# Altium PCB gocart.PcbDoc
Units mm, origin at the board's own origin, x right, y up, seen from the top; angles counter-clockwise.
Board outline 62.36 x 58.55 mm, 2 copper layers (Top Layer, Bottom Layer); 87 components, 55 nets, 207 pads, 23 vias.
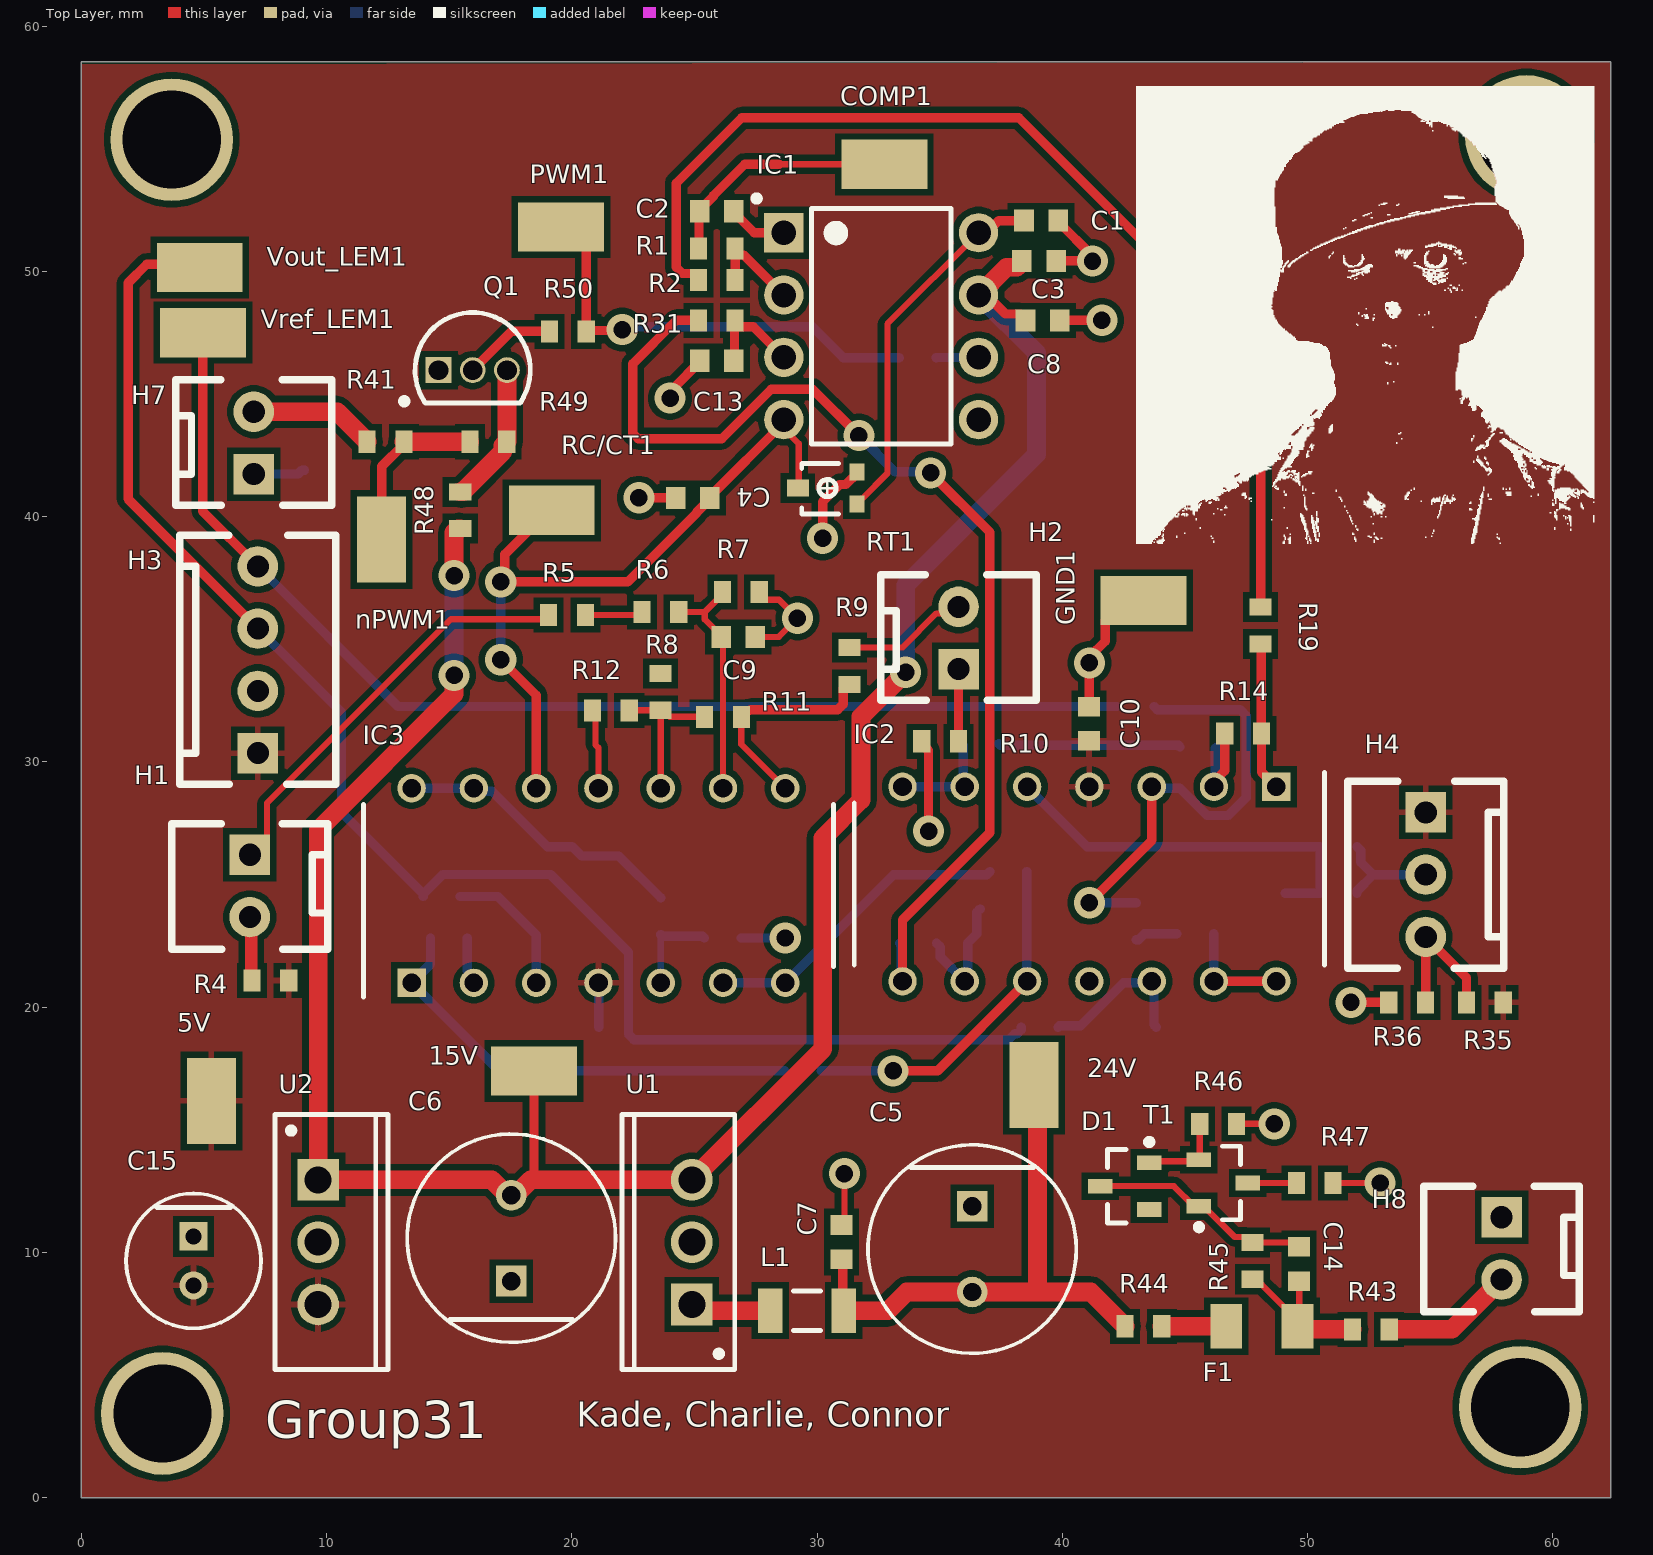
[diagram p0: Top Layer view]
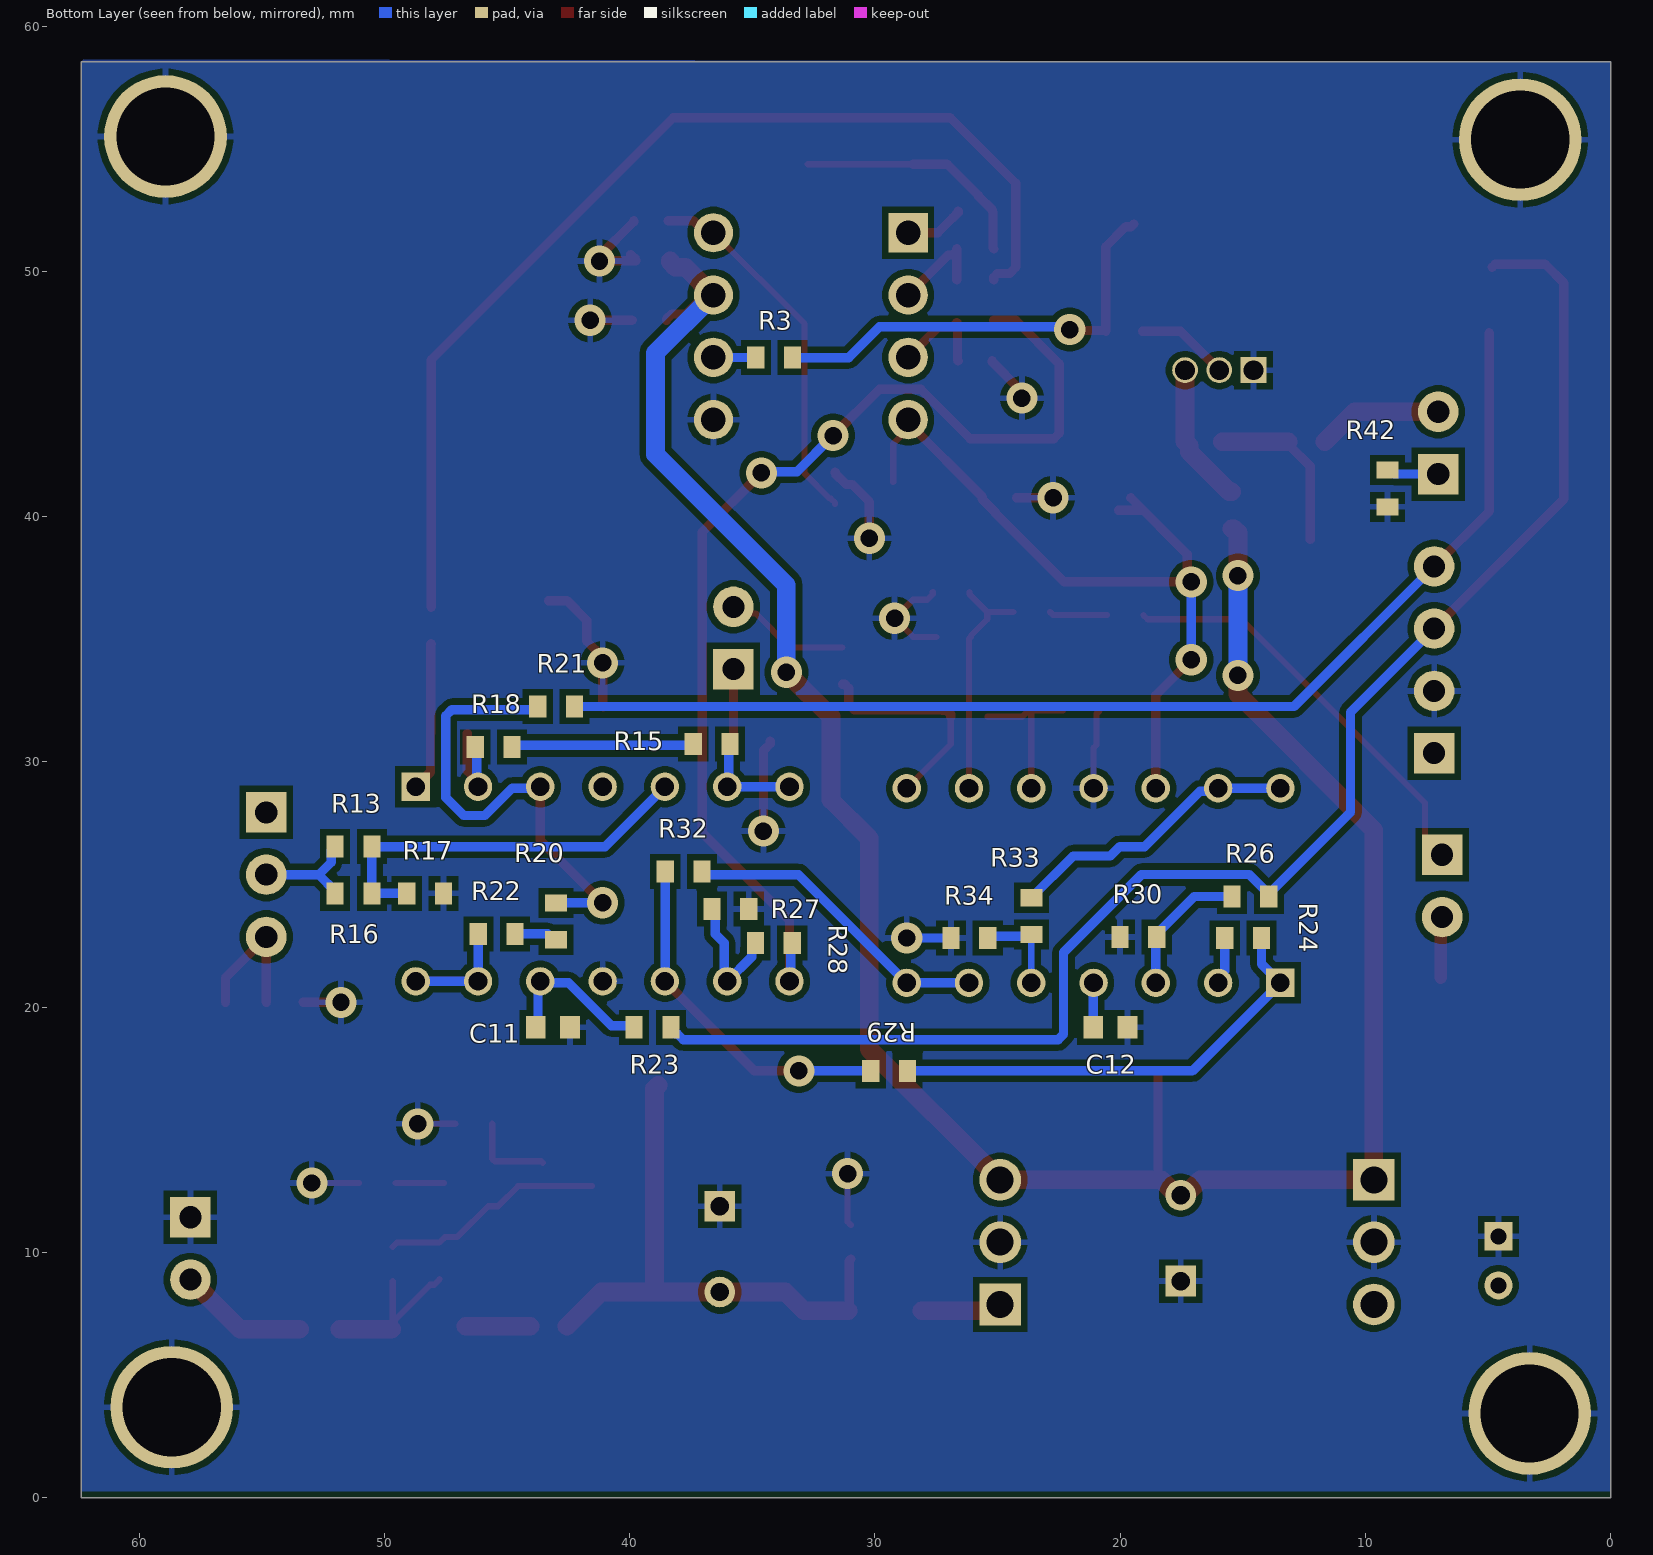
[diagram p1: Bottom Layer view, seen from below]

## Layer stack, top to bottom
Top Solder: solder mask 0.0102, Solder Resist, Dk 3.5
Top Layer: signal copper 0.0356
Dielectric 1: dielectric 0.32, FR-4, Dk 4.8
Bottom Layer: signal copper 0.0356
Bottom Solder: solder mask 0.0102, Solder Resist, Dk 3.5

## Board outline
0,0 62.357,0 62.357,58.547 0,58.547

## Design rules (kind name [scope] priority, off if disabled: settings)
Clearance [All] p1: gap=0.254 ignorepadtopadclearanceinfootprint=FALSE except(0: Arc-Hole Track-Hole SMDPad-Hole THPad-Hole Via-Hole Fill-Hole Poly-Hole Region-Hole Text-Hole)
MinimumSolderMaskSliver [All] p1: minsoldermaskwidth=0.15
PolygonConnect [All] p1: connectstyle=Relief reliefconductorwidth=0.254 reliefentries=4 polygonreliefangle="90 Angle" airgapwidth=0.254
RoutingVias [All] p1: holewidth=0.711 width=1.27 viastyle="Through Hole" minholewidth=0.711 minwidth=1.27 maxholewidth=0.711 maxwidth=1.27
SolderMaskExpansion [All] p1: expansion=0.102 istentingtop=FALSE
Width [All] p1: maxlimit=1.27 minlimit=0.15 preferedwidth=0.381 minimp=50.000000 maximp=50.000000 favimp=50.000000
29 further rules are at their usual default settings.

## Classes and differential pairs
component class volt_regulators: C5 C6 C7 C8 C15 L1 U1 U2
component class test_points: 5V 15V 24V COMP1 GND1 nPWM1 PWM1 Vout_LEM1 Vref_LEM1
component class pwm_inverter: Q1 R48 R49 R50
component class i_sense: 10K C12 C13 IC3 R24 R26 R27 R28 R29 R30 R31 R32 R33 R34
component class headers: C14 D1 F1 H3 H4 H7 H8 R35 R36 R41 R42 R43 R44 R45 R46 R47 T1
component class current_mode_controller: C1 C2 C3 C4 IC1 R1 R2 R3 RT1
component class brake_circuit: C9 H1 H2 R4 R5 R6 R7 R8 R9 R10 R11 R12
component class accelerator: C10 C11 IC2 R13 R14 R15 R16 R17 R18 R19 R20 R21 R22 R23

## Components (designator, comment, footprint, x,y, rotation, side; value= is the part's Value field where it differs from the comment)
5V "TP" TP_1206 5.3,16.176 r270 top
15V "TP" TP_1206 18.459,17.399 r180 top
24V "TP" TP_1206 38.838,16.818 r270 top
C1 "100nF" CAPC1608L 39.136,52.07 r180 top
C2 "1nF" CAPC1608L 25.908,52.451 r0 top
C3 "100nF" CAPC1608L 39.047,50.431 r0 top
C4 "22nF" CAPC1608L 24.929,40.767 r0 top
C5 "100uF" FP-ESLGM-MFG 36.322,10.132 r270 top
C6 "100uF" FP-ESLGM-MFG 17.532,10.578 r90 top
C7 "100nF" CAPC1608L 30.988,10.414 r270 top
C8 "100nF" CAPC1608L 39.198,48.006 r180 top
C9 "100nF" CAPC1608L 26.784,35.095 r0 top
C10 "1uF" CAPC1608L 41.084,31.554 r270 top
C11 "1uF" CAPC1608L 43.135,19.177 r0 bottom
C12 "100nF" CAPC1608L 20.402,19.177 r0 bottom
C13 "15nF" CAPC1608L 25.908,46.355 r0 top
C14 "15nF" CAPC1608L 49.657,9.525 r270 top
C15 "1uF" FP-UPW1E220MDD-MFG 4.572,9.652 r270 top value=22uF
COMP1 "TP" TP_1206 32.742,54.368 r180 top
D1 "4V7" SOT23_L 42.545,12.7 r180 top
F1 "5A" RESC3216N 48.133,6.985 r180 top
GND1 "TP" TP_1206 43.307,36.576 r0 top
H1 "brake switch" MOLEX_KK_2_HDR 6.867,26.212 r270 top value="2 Pin Molex KK HDR"
H2 "shutdown header" MOLEX_KK_2_HDR 35.769,33.782 r90 top value="2 Pin Molex KK HDR"
H3 "LEM (i_motor hall sensor)" MOLEX_KK_4_HDR 7.194,30.353 r90 top value="4 Pin Molex KK Hdr"
H4 "Acc header" MOLEX_KK_3_HDR 54.819,27.94 r270 top value="3 Pin Molex KK Hdr"
H7 "pwm connector" MOLEX_KK_2_HDR 7.029,41.737 r90 top value="2 Pin Molex KK HDR"
H8 "reverse polarity protection" MOLEX_KK_2_HDR 57.912,11.43 r270 top value="2 Pin Molex KK HDR"
IC1 "UC3843BNG" DIP794W56P254L959H533Q8B 32.615,47.764 r0 top
IC2 "LMC6484IN" DIP794W56P254L1905H533Q14N 41.103,25.019 r270 top
IC3 "LMC6484IN" DIP794W56P254L1905H533Q14N 21.084,24.956 r90 top
L1 "1A max, Idc 0.3R," INDC3216L 29.591,7.62 r180 top
nPWM1 "TP" TP_1206 12.241,39.065 r90 top
PWM1 "TP" TP_1206 19.558,51.816 r180 top
Q1 "2N7000G" ONSC-TO-92-3-29-11 15.957,45.974 r0 top
R1 "0R" RESC1608L 25.908,50.927 r180 top
R2 "10K" RESC1608L 25.908,49.657 r0 top
R3 "0R" RESC1608L 34.106,46.482 r180 bottom
R4 "0R" RESC1608L 7.702,21.082 r0 top
R5 "0R" RESC1608L 19.799,35.984 r0 top
R6 "100K" RESC1608L 23.609,36.111 r0 top
R7 "100K" RESC1608L 26.892,36.931 r0 top
R8 "10K" RESC1608L 23.621,32.852 r90 top
R9 "0R" RESC1608L 31.324,33.909 r90 top
R10 "0R" RESC1608L 35.017,30.839 r0 top
R11 "10K" RESC1608L 26.161,31.836 r180 top
R12 "10K" RESC1608L 21.589,32.09 r0 top
R13 "0R" RESC1608L 51.263,26.543 r180 bottom
R14 "0R" RESC1608L 47.374,31.158 r180 top
R15 "0R" RESC1608L 36.658,30.734 r180 bottom
R16 "0R" RESC1608L 51.263,24.638 r180 bottom
R17 "0R" RESC1608L 48.342,24.638 r180 bottom
R18 "0R" RESC1608L 45.548,30.607 r180 bottom
R19 "0R" RESC1608L 48.088,35.56 r270 top
R20 "0R" RESC1608L 43.008,23.495 r270 bottom
R21 "0R" RESC1608L 42.996,32.258 r180 bottom
R22 "0R" RESC1608L 45.421,22.987 r0 bottom
R23 "0R" RESC1608L 39.071,19.177 r0 bottom
R24 "0R" RESC1608L 14.985,22.819 r180 bottom
R26 "10K" RESC1608L 14.687,24.511 r0 bottom
R27 "10K" RESC1608L 35.896,24.003 r0 bottom
R28 "10K" RESC1608L 34.118,22.606 r180 bottom
R29 "10K" RESC1608L 29.419,17.399 r180 bottom
R30 "0R" RESC1608L 19.259,22.86 r180 bottom
R31 "1K" RESC1608L 25.908,48.006 r0 top
R32 "10K" RESC1608L 37.801,25.527 r0 bottom
R33 "0R" RESC1608L 23.621,23.708 r270 bottom
R34 "10K" RESC1608L 26.149,22.819 r180 bottom
R35 "0R" RESC1608L 57.232,20.193 r0 top
R36 "0R" RESC1608L 54.057,20.193 r0 top
R41 "0R" RESC1608L 12.401,43.053 r180 top
R42 "0R" RESC1608L 9.099,41.148 r90 bottom
R43 "0R" RESC1608L 52.578,6.858 r0 top
R44 "0R" RESC1608L 43.307,6.985 r0 top
R45 "12K" RESC1608L 47.752,9.652 r90 top
R46 "0R" RESC1608L 46.355,15.24 r180 top
R47 "0R" RESC1608L 50.292,12.827 r0 top
R48 "0R" RESC1608L 15.449,40.259 r270 top
R49 "0R" RESC1608L 16.592,43.053 r0 top
R50 "0R" RESC1608L 19.837,47.555 r180 top
RC/CT1 "TP" TP_1206 19.177,40.259 r180 top
RT1 "100K" PVZ2A 30.423,41.163 r90 top
T1 "BSH114,215" SOT23_L 46.57,12.827 r0 top
U1 "L7815CV" TO220 24.892,10.414 r90 top
U2 "L7805ACV" TO220 9.652,10.414 r270 top
Vout_LEM1 "TP" TP_1206 4.826,50.165 r180 top
Vref_LEM1 "TP" TP_1206 4.953,47.498 r0 top

## Footprints (in the part's own frame and the unit in brackets; to place one, negate y for a bottom-side part, rotate by r counter-clockwise, add the part's x,y. Pads: shape width x height; smd on the part's side, far side on the other; paste and mask are expansions set on the pad)
CAPC1608L [mm]
  rect 0.8x0.9 smd: 1(-0.7,0) 2(0.7,0)
  body extent -0.87,-0.48 0.87,0.48, height 0.85
DIP794W56P254L959H533Q8B [mm]
  rect 1.6x1.6 hole 1: 1(-3.97,3.81)
  round 1.6 hole 1: 2(-3.97,1.27) 3(-3.97,-1.27) 4(-3.97,-3.81) 5(3.97,-3.81) 6(3.97,-1.27) 7(3.97,1.27) 8(3.97,3.81)
  silkscreen extent -5.2,-4.8 2.85,5.33, body extent -4.11,-4.79 4.11,4.79, height 5.33
DIP794W56P254L1905H533Q14N [mm]
  rect 1.159x1.159 hole 0.759: 1(-3.969,7.62)
  round 1.159 hole 0.759: 2(-3.969,5.08) 3(-3.969,2.54) 4(-3.969,0) 5(-3.969,-2.54) 6(-3.969,-5.08) 7(-3.969,-7.62) 8(3.969,-7.62) 9(3.969,-5.08) 10(3.969,-2.54) 11(3.969,0) 12(3.969,2.54) 13(3.969,5.08) 14(3.969,7.62)
  silkscreen extent -4.55,-9.59 3.3,9.59, body extent -4.11,-9.52 4.11,9.53, height 5.33
FP-ESLGM-MFG [mm]
  rect 1.25x1.25 hole 0.75 paste-2539.97 mask+0: 1(-1.75,0)
  round 1.25 hole 0.75 paste-2539.97 mask+0: 2(1.75,0)
  silkscreen extent -4.25,-4.25 4.25,4.25, body extent -4.35,-4.35 4.35,4.35, height 0.25
FP-UPW1E220MDD-MFG [mm]
  rect 1.15x1.15 hole 0.65 paste-2539.97 mask+0: 1(-1,0)
  round 1.15 hole 0.65 paste-2539.97 mask+0: 2(1,0)
  silkscreen extent -2.75,-2.75 2.75,2.75, body extent -2.85,-2.85 2.85,2.85, height 0.25
INDC3216L [mm]
  rect 1x1.8 smd: 1(-1.5,0) 2(1.5,0)
  silkscreen extent -0.55,-0.8 0.55,0.8, body extent -1.75,-0.95 1.75,0.95, height 1.9
MOLEX_KK_2_HDR [mil]
  rect 65x65 hole 35.43: 1(0,0)
  round 65 hole 35.43: 2(100,0)
  silkscreen extent -50,-125 152,125, body extent -44,-121 146,119, height 630
MOLEX_KK_3_HDR [mil]
  rect 65x65 hole 35.43: 1(0,0)
  round 65 hole 35.43: 2(100,0) 3(200,0)
  silkscreen extent -50,-125 250,125, body extent -44,-120 244,119, height 10
MOLEX_KK_4_HDR [mil]
  rect 65x65 hole 35.43: 1(0,0)
  round 65 hole 35.43: 2(100,0) 3(200,0) 4(300,0)
  silkscreen extent -50,-125 350,125, body extent -44,-119 343,119, height 630
ONSC-TO-92-3-29-11 [mm]
  rect 1.05x1.05 hole 0.8: 1(-1.397,0)
  round 1.05 hole 0.8: 2(0,0) 3(1.397,0)
  silkscreen extent -2.92,-1.39 2.35,2.35, body extent -2.35,-1.33 2.36,2.36, height 7.87
PVZ2A [mm]
  rect 0.7x0.6 smd: 1(-0.65,-1.2) 3(0.65,-1.2)
  rect 0.7x0.9 smd: 2(0,1.2)
  silkscreen extent -1.05,-0.45 1,1.05, body extent -0.95,-0.82 0.92,0.96, height 1.6
RESC1608L [mm]
  rect 0.7x0.9 smd: 1(-0.75,0) 2(0.75,0)
  body extent -0.85,-0.48 0.85,0.48, height 0.9
RESC3216N [mm]
  rect 1.3x1.8 smd: 1(-1.45,0) 2(1.45,0)
  body extent -1.68,-0.87 1.68,0.87, height 0.71
SOT23_L [mm]
  rect 1x0.6 smd: 1(-1,-0.95) 2(-1,0.95) 3(1,0)
  silkscreen extent -1.13,-1.92 0.7,1.5, body extent -0.7,-1.5 0.7,1.5, height 1.1
TO220 [mm]
  rect 1.7x1.7 hole 1.1: 1(-2.54,0)
  round 1.7 hole 1.1: 2(0,0) 3(2.54,0)
  silkscreen extent -5.2,-1.75 5.2,2.85, body extent -5.25,-1.8 5.25,2.9, height 19.7
TP_1206 [mm]
  rect 3.5x2 smd: 1(0,0)
  body extent -1.62,-0.85 1.63,0.8, height 2

## Part data
5V 15V 24V COMP1 GND1 nPWM1 PWM1 RC/CT1 Vout_LEM1 Vref_LEM1: library part TP_1206, "Test-Point 3.3x1.6x2.1mm SMD", Manufacturer="Harwin Inc", Manufacturer Part Number=S1751-46R, Supplier Part Number 1=952-1478-2-ND, Mounting Type="Surface Mount", Storage Location=ProtoPlace, Supplier="ECE Dept", Supplier 1=Digi-Key, Supplier 2=Farnell, Supplier Part Number 2=1826282, Type="PC Test Point"
C1 C3 C7 C8 C9 C12: library part CC_100nF_0603, "CAP CER 100nF X7R +-10% 50V 0603", Code_IPC="1608 [0603]", PackageReference=0603, Storage Location="PCB Assembly WS", Supplier="ECE Dept"
C2: library part CC_1nF_0603, "CAP CER 1nF X7R +-10% 50V 0603", Code_IPC="1608 [0603]", PackageReference=0603, Storage Location="PCB Assembly WS", Supplier="ECE Dept"
C4: library part CC_22nF_0603, "CAP CER 22nF X7R +-10% 50V 0603", Code_IPC="1608 [0603]", PackageReference=0603, Storage Location="PCB Assembly WS", Supplier="ECE Dept"
C5 C6: library part CMP-03015-000005-1, "CAP ALUM 100UF 20% 50V THRU HOLE. Part Number: ESL107M050AGMAA. Dia: 8mm.", Leakage Current=50uA, Manufacturer=KEMET, Manufacturer Part Number=ESL107M050AGMAA, Package=ESLGM, Ripple Current=725mA, Temperature="-40°C to +105°C", Temperature Range High=+105°C, Temperature Range Low=-40°C, Tolerance=20%, Voltage Rating=50V, Automotive=No, Capacitance=100uF, Category=Cap, ComponentLink2Description=Datasheet, ComponentLink2URL=https://content.kemet.com/datasheets/KEM_A4074_ESL.pdf, Device Class L1="Passive Components", Device Class L2=Capacitors, Device Class L3="Aluminum Electrolytic Capacitors", Digikey Description="CAP ALUM 100UF 20% 50V THRU HOLE", Dissipation Factor=10%, Esr=0.12Ω, Height=13.5mm, Lead Free=Yes, Life=10000Hours, Manufacturer 1=KEMET, Manufacturer Part Number 1=ESL107M050AGMAA, Material=Aluminum, Octopart=https://octopart.com/esl107m050agmaa-kemet-84758890, RoHS=TRUE
C10 C11: library part CC_1uF_0603, "CAP CER 1uF Y5V -20% +80% 16V 0603", Max Voltage=16V, Code_IPC="1608 [0603]", PackageReference=0603, Storage Location="PCB Assembly WS", Supplier="ECE Dept"
C13 C14: library part CC_15nF_0603, "CAP CER 15nF X7R +-10% 50V 0603", Code_IPC="1608 [0603]", PackageReference=0603, Storage Location="PCB Assembly WS", Supplier="ECE Dept"
C15: library part CMP-12462-000010-1, "CAP ALUM 22UF 20% 25V RADIAL. Part Number: UPW1E220MDD. Dia: 5mm.", Capacitance=22uF, Leakage Current=16.5uA, Manufacturer=Nichicon, Manufacturer Part Number=UPW1E220MDD, Package=0, Ripple Current=180mA, Temperature="-55°C to +105°C", Temperature Range High=+105°C, Temperature Range Low=-55°C, Tolerance=20%, Voltage Rating=25V, Automotive=Yes, Automotive Grade="Grade 2", Category=Cap, ComponentLink2Description=Datasheet, ComponentLink2URL=https://products.nichicon.co.jp/en/pdf/XJA043/e-upw.pdf, Device Class L1="Passive Components", Device Class L2=Capacitors, Device Class L3="Aluminum Electrolytic Capacitors", Digikey Description="CAP ALUM 22UF 20% 25V RADIAL", Dissipation Factor=14%, Height=12.5mm, Lead Free=Yes, Life=2000Hours, Manufacturer 1=Nichicon, Manufacturer Part Number 1=UPW1E220MDD, Material=Aluminum, Octopart=https://octopart.com/upw1e220mdd-nichicon-202818, RoHS=TRUE
D1: library part DZ_4.7V, "BZX84C4V7LT1G - DIODE, ZENER, 4.7V, 225MW, SOT23", Breakdown Voltage Max=5, Breakover Voltage Min=4.7, Diode Case Style=SOT-23, Manufacturer="ON SEMICONDUCTOR", Manufacturer Part Number=BZX84C4V7LT1G, Power Dissipation Pd=225, Supplier Part Number 1=1459051, Supplier 1=Farnell, Supplier 2=Digi-Key, Supplier Part Number 2=BZX84C4V7LT1GOSCT-ND
F1: library part FS_Fuse_5.0A, "Fuse 5.0A Fast Acting 1206 SMD", Case Code (Imperial)=1206, Case Code (Metric)=3216, DC Cold Resistance=19mR, Manufacturer="Bel TRP", Manufacturer Part Number=C1F5, Max Operating Temperature=125°C, Min Operating Temperature=-55°C, Supplier Part Number 1=507-1886-1-ND, Voltage Rating=125V, Voltage Rating (DC)=63V, Approvals=CE,cURus, Case/Package=1206, ComponentLink1Description=http://www.farnell.com/datasheets/2571625.pdf, ComponentLink1URL=http://www.farnell.com/datasheets/2571625.pdf, ComponentLink2Description=http://belfuse.com/pdfs/C1F.pdf, ComponentLink2URL=http://belfuse.com/pdfs/C1F.pdf, ComponentLink3Description=http://www.mouser.com/ds/2/643/C1F-594910.pdf, ComponentLink3URL=http://www.mouser.com/ds/2/643/C1F-594910.pdf, ComponentLink4Description=https://belfuse.com/resources/StewartConnector/C1F.pdf, ComponentLink4URL=https://belfuse.com/resources/StewartConnector/C1F.pdf, Contact Plating=Nickel,Tin, Current Rating=5A, Fuse Type="Board Mount (Cartridge Style Excluded)", Length=0.126inch, Mount="Surface Mount", Number of Pins=2, Packaging="Tape and Reel", Pricing 1="1=0.32, 5=0.312, 10=0.298, 50=0.2662, 100=0.2479, 250=0.22032, 500=0.1836, 1000=0.17442 (USD)", Stock 1=725, Supplier 1=Digi-Key, Supplier 2=Element14, Supplier Part Number 2=2848595, Voltage Rating (AC)=125V, Width=0.062inch
H1: library part JA_MOLEX_KK_2POS, Supplier Part Number 1=1462926, Storage Location="ECE Dept Store", Supplier="ECE Dept", Supplier 1=Farnell
H2 H7 H8: library part JA_MOLEX_KK_2POS, "CONN HEADER 2POS 2.54mm VERT_Thru Hole", Supplier Part Number 1=1462926, Storage Location="ECE Dept Store", Supplier="ECE Dept", Supplier 1=Farnell
H3: library part JA_MOLEX_KK_4POS, "CONN HEADER 4POS 2.54mm VERT_Thru Hole", Manufacturer=Molex, Manufacturer PN=22-23-2041, Supplier Part Number 1=9731164, Storage Location="ECE Dept Store", Supplier="ECE Dept", Supplier 1=Farnell
H4: library part JA_MOLEX_KK_3POS, "CONN HEADER 3POS 2.54mm VERT_Thru Hole", Manufacturer=Molex, Manufacturer PN=22-23-2031, Supplier Part Number 1=9731156, Storage Location="ECE Dept Store", Supplier="ECE Dept", Supplier 1=Farnell
IC1: "Integrated Circuit", Manufacturer_Name="ON Semiconductor", Mouser Part Number=863-UC3843BNG, Arrow Part Number=UC3843BNG, Arrow Price/Stock=https://www.arrow.com/en/products/uc3843bng/on-semiconductor, Datasheet Link=http://www.onsemi.com/pub/Collateral/UC3842B-D.PDF, Height=5.33mm, Manufacturer_Part_Number=UC3843BNG, Mouser Price/Stock=https://www.mouser.co.uk/ProductDetail/ON-Semiconductor/UC3843BNG?qs=xZq1yRCsb1c8CkSt0UbHMA%3D%3D
IC2 IC3: "Integrated Circuit", Manufacturer_Name="Texas Instruments", Mouser Part Number=926-LMC6484IN, Arrow Part Number=LMC6484IN, Datasheet Link=http://www.ti.com/lit/gpn/lmc6484, Height=5.334mm, Manufacturer_Part_Number=LMC6484IN, Mouser Price/Stock=https://www.mouser.com/Search/Refine.aspx?Keyword=926-LMC6484IN
L1: library part IN_Ferrite-Bead, "Ferrite Bead, Rdc 0.3R, Z100MHZ 600R, Imax 1A, SMD 1206", DC Current Rating=1, DC Resistance Max=0.08, Ferrite Case Style="1206 ^3216 Metric]", Frequency Range="50MHz to 1", Impedance Tolerance="± 25%", Manufacturer=FAIR-RITE, Manufacturer Part Number=2512066017Y1, Supplier Part Number 1=1612060, Ferrite Mounting=SMD, Impedance=600, Manufacturer PN=2512066017Y1, Storage Location="PCB Assembly WS", Supplier="ECE Dept", Supplier 1=Farnell
Q1: library part CMP-1058-00937-1, "Small Signal MOSFET, 200 mA, 60 V, N-Channel, 3-Pin TO-92, Pb-Free, Bulk Box", Manufacturer="On Semiconductor", Manufacturer 1="ON Semiconductor", Package Type=TO-92, Channel Polarity="N Channel", Ciss Typ (pF)=60, ComponentLink1Description="Manufacturer URL", ComponentLink1URL=http://www.onsemi.com/, ComponentLink2Description=Datasheet, ComponentLink2URL=http://www.onsemi.com/pub_link/Collateral/2N7000-D.PDF, ComponentLink3Description="Package Specification", ComponentLink3URL=http://www.onsemi.cn/pub_link/Collateral/2N6426-D.PDF, Configuration=Single, Coss Typ (pF)=25, Crss Typ (pF)=5, DatasheetVersion="Rev. 8", ID Max (A)=0.2, Manufacturer Part Number 1=2N7000G, Mounting Technology="Through Hole", PackageDescription="3-Pin Transistor Outline, Body 4.825 x 3.685 mm, Pitch 1.27 mm", PackageReference=TO-92-3-29-11_AM_SL, PackageVersion="Rev. AM", Packing="Bulk Box", PartNumber=2N7000G, PD Max (W)=0.35, RoHS=Pb-Free, V(BR)DSS Min (V)=60, VGS Max (V)=20, VGS(th) Max (V)=3
R1 R3 R4 R5 R9 R10 R13 R14 R15 R16 R17 R18 R19 R20 R21 R22 R23 R24 R30 R33 R35 R36 R41 R42 R43 R44 R45 R46 R47 R48 R49 R50: library part RS_0R0, "RES 0.0 OHM 1/10W 5% 0603 SMD", Storage Location="PCB Assembly WS", Supplier="ECE Dept"
R2 R8 R11 R12 R26 R27 R28 R29 R32 R34: library part RS_10K, "RES 10.0K OHM 1/10W 5% 0603 SMD", Storage Location="PCB Assembly WS", Supplier="ECE Dept"
R6 R7: library part RS_100K, "RES 100K OHM 1/10W 5% 0603 SMD", Storage Location="PCB Assembly WS", Supplier="ECE Dept"
R31: library part RS_1K, "RES 1.0K OHM 1/10W 5% 0603 SMD", Storage Location="PCB Assembly WS", Supplier="ECE Dept"
RT1: library part RM_100K, "Trim Pot SMD 100K Murata PVZ2 Series SMD", Manufacturer=MURATA, Manufacturer Part Number=PVZ2A104C04B00, Power Rating=50, Resistor Element Material="Metal Foil", Supplier Part Number 1=1771728, Adjustment Type=Top, External Depth=2.7, External Length / Height=0.85, External Width=2.1, No. of Turns=1, Potentiometer Mounting=SMD, Series=PVZ2, Storage Location="PCB Assembly WS", Supplier="ECE Dept", Supplier 1=Farnell
T1: library part TM_BSH114, "MOSFET N-CH 100V 0.85A SOT-23", Continuous Drain Current Id=500, Current Id Max=850, Drain Source Voltage Vds=100, Power Dissipation Pd=830, Supplier Part Number 1=1758071RL, Transistor Case Style=SOT-23, Voltage Vds Typ=130, Voltage Vgs Max=3, Voltage Vgs Rds on Measurement=10, Manufacturer Part Number=BSH114,215, Supplier 1=Farnell, Transistor Type=Enhancement
U1: library part CMP-0244-00422-1, "Positive Voltage Regulator, 15V, 3-Pin TO-220", Manufacturer 1=STMicroelectronics, ComponentLink1Description="Manufacturer URL", ComponentLink1URL=http://www.st.com, ComponentLink2Description=Datasheet, ComponentLink2URL=http://www.st.com/internet/com/TECHNICAL_RESOURCES/TECHNICAL_LITERATURE/DATASHEET/CD00000444.pdf, ComponentLink3Description="Package Specification", ComponentLink3URL=http://www.st.com/internet/com/TECHNICAL_RESOURCES/TECHNICAL_LITERATURE/PACKAGE_INFORMATION/CD00004649.pdf, DatasheetVersion=16/11/2011, Manufacturer Part Number 1=L7815CV, PackageDescription="TO, Thru-Hole, Vertical, Heatsink Mounted; 3 In-Line Leads; Pitch 2.54 mm", PackageReference=TO220, PackageVersion=ver3.0
U2: library part CMP-0244-00484-1, "Positive Voltage Regulator, 5V, 3-Pin TO-220", Manufacturer 1=STMicroelectronics, ComponentLink1Description="Manufacturer URL", ComponentLink1URL=http://www.st.com, ComponentLink2Description=Datasheet, ComponentLink2URL=http://www.st.com/internet/com/TECHNICAL_RESOURCES/TECHNICAL_LITERATURE/DATASHEET/CD00000444.pdf, ComponentLink3Description="Package Specification", ComponentLink3URL=http://www.st.com/internet/com/TECHNICAL_RESOURCES/TECHNICAL_LITERATURE/PACKAGE_INFORMATION/CD00004649.pdf, DatasheetVersion=16/11/2011, Manufacturer Part Number 1=L7805ACV, PackageDescription="TO, Thru-Hole, Vertical, Heatsink Mounted; 3 In-Line Leads; Pitch 2.54 mm", PackageReference=TO220, PackageVersion=ver3.0

## Free pads (board coordinates)
  round 5 hole 4: 2(58.674,3.683) 4(3.683,55.372) 5(3.302,3.429) ""(58.928,55.499)

## Via types
v1: diameter 1.27, hole 0.711, Top Layer to Bottom Layer, 23 vias

## Nets (pads, with @x,y where several pads share a name; then routed paths per layer and width w, separated by ;. In a path a pad name is that pad's centre, name@x,y a point inside that pad or via, vN(x,y) a via of type N, cw(c..) or ccw(c..) an arc to the next point about the centre after c; other vN are vias at no path point)
5V: 5V.1 C10.2 C12.2 C15.2 H3.1 H4.1 IC2.4 IC3.4 R4.2 R35.2 U2.3 | length 1.8
  Bottom Layer w0.381: IC3.4 21.093,20.978 21.093,19.186 C12.2
15V: 15V.1 C3.1 C6.2 C8.2 IC1.7 R48.2 U1.3 U2.1 | length 97.8
  Top Layer w0.381: C6.2 18.459,13.254 15V.1 ; IC1.7 36.915,49.034 37.683,48.265 38.289,48.265 38.498,48.056 C8.2
  Top Layer w0.762: v1(15.195,33.528) 15.195,32.766 9.652,27.223 U2.1 16.736,12.954 17.362,12.328 C6.2 17.702,12.328 18.329,12.954 U1.3 30.226,18.288 30.226,26.879 31.791,28.444 31.791,31.833 v1(33.61,33.653) ; v1(15.195,37.592) 15.195,39.349 15.355,39.509 R48.2 ; IC1.7 37.722,50.172 38.137,50.172 38.347,50.381 C3.1
  Bottom Layer w0.762: v1(15.195,33.528) v1(15.195,37.592) ; v1(33.61,33.653) 33.61,37.211 38.944,42.545 38.944,46.675 IC1.7
24V: 24V.1 C5.2 C7.2 L1.1 R44.1 | length 23
  Top Layer w0.381: C7.2 31.04,9.663 31.04,7.671 L1.1
  Top Layer w0.762: L1.1 32.893,7.62 33.655,8.382 C5.2 38.989,8.382 ; 24V.1 38.989,16.667 38.989,8.382 ; R44.1 41.16,8.382 38.989,8.382
Acc_pot: H4.2 R13.1 R16.1 | length 4.6
  Bottom Layer w0.381: R16.1 52.013,24.738 52.675,25.4 ; R13.1 52.173,26.384 52.173,25.902 52.675,25.4 ; H4.2 52.675,25.4
COMP: C2.1 COMP1.1 R1.2 | length 9.9
  Top Layer w0.254: 28.448,54.368 COMP1.1
  Top Layer w0.381: R1.2 25.183,50.952 25.183,52.426 C2.1 25.208,52.501 25.763,53.057 25.763,53.085 27.047,54.368 28.448,54.368
Error: R2.1 R19.1 | length 43.7
  Top Layer w0.381: R2.1 25.158,49.757 24.998,49.917 24.505,49.917 24.257,50.165 24.257,53.594 26.924,56.261 38.227,56.261 48.088,46.4 R19.1
GND: C1.1 C3.2 C4.1 C5.1 C6.1 C7.1 C8.1 C9.2 C10.1 C11.1 C12.1 C13.1 C15.1 GND1.1 H3.2 H8.1 IC1.5 IC2.11 IC3.11 pad. pad.2 pad.4 pad.5 Q1.1 R7.2 R10.1 R12.1 R17.2 R27.1 R30.1 R34.1 R36.1 R42.1 R46.1 R47.2 RT1.3 U1.2 U2.2 | length 38.2
  Top Layer w0.254: R12.1 20.962,31.967 20.962,30.699 21.084,30.576 IC3.11 ; C4.1 C4.1@24.257,40.795 ; C9.2 28.435,35.095 v1(29.197,35.857) 28.446,36.608 27.865,36.608 27.642,36.831 R7.2 ; C7.1 31.115,11.241 v1(31.115,13.208) ; R46.1 v1(48.641,15.24) ; R47.2 v1(52.959,12.827)
  Top Layer w0.381: v1(22.733,40.767) C4.1 ; v1(24.003,44.831) 24.173,45.001 24.173,45.27 25.208,46.305 C13.1 ; v1(30.226,39.116) 30.226,40.613 30.92,41.308 31.168,41.308 31.623,41.763 RT1.3 ; R10.1 34.267,30.739 34.544,30.462 v1(34.544,27.178) ; C1.1 39.836,52.02 41.23,50.626 v1(41.23,50.419) ; C8.1 v1(41.611,48.006) ; C3.2@39.956,50.691 39.747,50.481 C3.2 v1@40.964,50.431 ; C10.1 41.094,32.263 41.094,34.027 v1(41.103,34.036) 41.103,34.277 41.747,34.921 41.747,35.766 42.557,36.576 GND1.1 ; v1(51.771,20.193) R36.1
  Bottom Layer w0.381: R34.1 v1(28.701,22.819)
I_sense: C13.2 IC1.3 R31.2 | length 4.1
  Top Layer w0.381: C13.2 26.633,46.38 26.633,47.881 26.658,47.906 26.818,47.747 27.393,47.747 IC1.3
NetC1_2: C1.2 IC1.8 RT1.1 | length 15.2
  Top Layer w0.254: RT1.1 31.623,40.563 31.796,40.736 31.846,40.736 32.869,41.759 32.869,47.858 IC1.8
  Top Layer w0.381: IC1.8 36.915,51.574 37.41,52.07 C1.2
NetC2_2: C2.2 IC1.1 | length 2.4
  Top Layer w0.381: C2.2 26.608,52.401 26.818,52.192 26.822,52.192 27.439,51.574 IC1.1
NetC9_1: C9.1 IC3.9 R6.2 R7.1 | length 9.7
  Top Layer w0.254: R6.2 25.422,36.111 ; R7.1 26.142,36.831 25.422,36.111 ; IC3.9 26.164,35.015 C9.1 26.084,35.145 25.422,35.807 25.422,36.111
NetC11_2: C11.2 IC2.12 R23.2 | length 6.6
  Bottom Layer w0.381: R23.2 39.885,19.241 40.743,19.241 42.492,20.991 43.584,20.991 IC2.12 43.739,20.954 43.739,19.273 C11.2
NetC14_1: C14.1 D1.3 R45.2 T1.1 | length 9.1
  Top Layer w0.254: D1.3 44.547,12.7 45.37,11.877 T1.1 45.77,11.877 47.022,10.625 47.529,10.625 R45.2 49.48,10.402 C14.1
NetC14_2: C14.2 F1.1 R43.1 R45.1 | length 6.9
  Top Layer w0.254: R45.1 47.975,8.679 48.139,8.679 49.583,7.235 F1.1 ; C14.2 49.657,7.059 F1.1 ; F1.1@49.71,6.858 F1.1
  Top Layer w0.762: F1.1@49.71,6.858 R43.1
NetD1_1: D1.1 R46.2 T1.2 | length 3.6
  Top Layer w0.254: D1.1 43.609,13.714 45.506,13.714 T1.2 45.605,13.812 R46.2
NetF1_2: F1.2 R44.2 | length 2.6
  Top Layer w0.762: R44.2 F1.2
NetH1_1: H1.1 R5.1 | length 17.1
  Top Layer w0.254: H1.1 7.566,26.91 7.566,28.312 15.068,35.814 18.88,35.814 R5.1
NetH1_2: H1.2 R4.1 | length 2.6
  Top Layer w0.254: H1.2 H1.2@6.925,23.614 ; R4.1@6.925,21.189 R4.1@6.982,21.132
  Top Layer w0.508: R4.1@6.925,21.189 H1.2@6.925,23.614
NetH2_1: H2.1 R10.2 | length 2.9
  Top Layer w0.381: R10.2 35.767,33.78 H2.1
NetH2_2: H2.2 R9.2 | length 5.1
  Top Layer w0.254: R9.2 33.471,34.659 34.867,36.055 35.502,36.055 H2.2
NetH4_3: H4.3 R35.1 R36.2 | length 6
  Top Layer w0.381: R36.2 54.813,20.199 54.813,22.854 H4.3 56.482,21.197 R35.1
NetH7_1: H7.1 R42.2 | length 2.1
  Bottom Layer w0.381: H7.1 8.838,41.737 8.999,41.898 R42.2
NetH7_2: H7.2 R41.2 | length 5.1
  Top Layer w0.762: H7.2 10.427,44.277 R41.2
NetH8_2: H8.2 R43.2 | length 5.5
  Top Layer w0.254: R43.2@53.328,6.731 R43.2@53.465,6.868
  Top Layer w0.762: R43.2@53.465,6.868 55.89,6.868 H8.2
NetIC1_2: IC1.2 R1.1 R2.2 | length 4
  Top Layer w0.381: R2.2 R1.1@26.658,50.827 ; R1.1 R1.1@26.658,50.827 ; IC1.2 27.012,50.667 26.818,50.667 R1.1@26.658,50.827
NetIC1_6: IC1.6 R3.1 | length 1.7
  Bottom Layer w0.381: R3.1 34.862,46.488 36.579,46.488 IC1.6
NetIC2_1: IC2.1 R14.1 R19.2 | length 6.1
  Top Layer w0.381: R19.2 48.106,34.792 48.106,31.176 R14.1 48.124,29.587 IC2.1
NetIC2_2: IC2.2 R14.2 R18.1 | length 4
  Top Layer w0.381: IC2.2 46.183,29.199 46.624,29.639 R14.2
  Bottom Layer w0.381: IC2.2 46.241,29.045 46.241,30.55 R18.1
NetIC2_3: IC2.3 R20.1 R21.1 | length 19.6
  Top Layer w0.381: v1(41.103,24.257) 43.643,26.797 IC2.3
  Bottom Layer w0.381: v1(41.103,24.257) 41.109,24.251 43.002,24.251 R20.1 ; IC2.3 43.702,28.929 44.794,28.929 45.91,27.813 46.767,27.813 47.498,28.544 47.498,31.877 47.244,32.131 43.873,32.131 R21.1
NetIC2_5: IC2.5 R13.2 R16.2 R17.1 | length 16.3
  Bottom Layer w0.381: IC2.5 41.008,26.543 R13.2 R16.2 R17.1
NetIC2_6: IC2.6 IC2.7 R15.2 | length 4.3
  Bottom Layer w0.381: IC2.7 IC2.6 35.966,29.045 35.966,30.677 R15.2
NetIC2_8: IC2.8 R28.2 R31.1 | length 45.5
  Top Layer w0.381: R31.1 24.257,48.006 22.479,46.228 22.479,43.403 22.702,43.18 26.11,43.18 28.129,45.199 29.81,45.199 v1(31.705,43.303) ; IC2.8 33.483,23.554 37.047,27.118 37.047,39.362 v1(34.626,41.783)
  Bottom Layer w0.381: v1(31.705,43.303) 33.179,41.829 34.58,41.829 v1(34.626,41.783) ; R28.2 33.426,22.549 33.426,21.108 IC2.8
NetIC2_9: IC2.9 R27.2 R28.1 | length 5.2
  Bottom Layer w0.381: R28.1 35.028,22.447 35.028,22.046 IC2.9 36.144,21.171 36.144,22.612 36.514,22.981 36.514,23.87 R27.2
NetIC2_10: IC2.10 R29.1 R32.2 | length 14.4
  Top Layer w0.381: v1(33.102,17.399) 34.912,17.399 IC2.10
  Bottom Layer w0.381: R29.1 v1(33.102,17.399) ; IC2.10@38.551,21.062 R32.2
NetIC2_13: IC2.13 IC2.14 R22.2 | length 7
  Top Layer w0.381: IC2.13 IC2.14
  Bottom Layer w0.381: R22.2 46.177,22.981 46.177,21.056 IC2.13 IC2.14
NetIC3_1: IC3.1 R24.2 R29.2 | length 18.8
  Bottom Layer w0.381: R24.2 14.235,21.758 IC3.1 17.053,17.399 R29.2
NetIC3_2: IC3.2 R24.1 | length 1.9
  Bottom Layer w0.381: R24.1 15.735,21.467 16.004,21.198 IC3.2
NetIC3_3: IC3.3 R26.2 R30.2 | length 5.7
  Bottom Layer w0.381: R26.2 16.973,24.511 17.1,24.384 18.544,22.94 IC3.3
NetIC3_5: IC3.5 R33.2 R34.2 | length 3.8
  Bottom Layer w0.254: IC3.5 R33.2@23.624,22.954
  Bottom Layer w0.381: R33.2 23.624,22.954 23.691,22.888 25.33,22.888 R34.2
NetIC3_6: IC3.6 IC3.7 R32.1 | length 12.8
  Bottom Layer w0.381: IC3.6 IC3.7 33.117,25.4 36.924,25.4 R32.1
NetIC3_8: IC3.8 R9.1 R11.1 | length 9.1
  Top Layer w0.254: R11.1 26.911,30.718 IC3.8
  Top Layer w0.381: R11.1 26.911,31.936 27.071,32.095 27.258,32.095 27.294,32.131 30.841,32.131 31.065,32.354 31.065,32.999 31.224,33.159 R9.1
NetIC3_10: IC3.10 R8.1 R11.2 R12.2 | length 6.4
  Top Layer w0.254: R12.2 22.351,32.102 R8.1 ; IC3.10 23.624,32.098 R8.1 ; R11.2 23.987,31.836 23.721,32.102 R8.1
NetIC3_13: IC3.13 IC3.14 R33.1 | length 12
  Bottom Layer w0.381: IC3.14 IC3.13 16.128,28.802 16.746,28.802 19.005,26.543 20.021,26.543 20.402,26.162 21.917,26.162 R33.1
NetL1_2: L1.2 U1.1 | length 3.3
  Top Layer w0.254: U1.1 U1.1@25.146,7.62
  Top Layer w0.762: U1.1@25.146,7.62 L1.2
NetQ1_2: Q1.2 R50.2 | length 3.8
  Top Layer w0.381: Q1.2 17.539,47.555 R50.2
NetQ1_3: Q1.3 R48.1 R49.2 | length 5.8
  Top Layer w0.762: R48.1 15.549,41.009 17.183,42.642 17.183,42.894 R49.2 17.354,43.065 Q1.3 Q1.3@17.348,45.968
NetR5_2: R5.2 R6.1 | length 2.4
  Top Layer w0.254: R5.2 22.732,35.984 R6.1
NetR15_1: R15.1 R18.2 | length 7.4
  Bottom Layer w0.381: R15.1 37.472,30.671 44.735,30.671 R18.2
NetR20_2: R20.2 R22.1 | length 1.8
  Bottom Layer w0.381: R20.2 43.108,22.745 43.35,22.987 R22.1
NetR47_1: R47.1 T1.3 | length 2
  Top Layer w0.254: T1.3 R47.1
nPWM: nPWM1.1 R41.1 R49.1 | length 7.1
  Top Layer w0.381: nPWM1.1 12.241,42.043 13.151,42.953 R41.1
  Top Layer w0.762: R41.1 R49.1
PWM: PWM1.1 R3.2 R50.1 | length 18.3
  Top Layer w0.381: PWM1.1@19.444,51.93 PWM1.1 19.777,51.816 20.587,51.006 R50.1 20.621,47.59 22.018,47.59 v1(22.053,47.625)
  Bottom Layer w0.381: v1(22.053,47.625) 22.167,47.739 29.815,47.739 31.072,46.482 R3.2
RT/CT: C4.2 IC1.4 IC3.12 RC/CT1.1 RT1.2 | length 31.2
  Top Layer w0.254: IC1.4@28.645,43.59 29.256,42.979 RT1.2@29.256,41.414
  Top Layer w0.381: v1(17.1,34.163) 18.544,32.719 IC3.12 ; RC/CT1.1 RC/CT1.1@20.066,40.259 ; RC/CT1.1@19.57,40.767 17.27,38.467 17.27,37.508 v1(17.1,37.338) 22.279,37.338 25.083,40.142 25.083,40.171 25.629,40.717 C4.2 25.629,40.817 28.645,43.833 IC1.4
  Bottom Layer w0.381: v1(17.1,34.163) v1(17.1,37.338)
V_out_LEM: H3.3 R23.1 R26.1 Vout_LEM1.1 | length 63
  Top Layer w0.381: Vout_LEM1.1 4.699,50.292 2.667,50.292 1.905,49.53 1.905,40.722 H3.3
  Bottom Layer w0.381: H3.3 10.607,32.02 10.607,27.941 R26.1@13.937,24.611 ; R26.1 R26.1@13.937,24.611 ; R23.1 38.321,19.077 38.162,18.917 38.062,18.917 37.813,18.669 22.53,18.669 22.307,18.892 22.307,22.225 19.127,25.405 14.732,25.405 R26.1@13.937,24.611
V_ref_LEM: H3.4 R21.2 Vref_LEM1.1 | length 47.9
  Top Layer w0.381: Vref_LEM1.1 4.953,40.214 H3.4
  Bottom Layer w0.381: H3.4 12.909,32.258 R21.2
pads on no net: D1.2 R8.2

## Polygon pours and split planes (outlines as drawn)
GND on Bottom Layer "GND_L02_P002" (solid, pour order 2): 0,58.547 0,0.254 62.357,0.254 62.357,58.645
5V on Top Layer "5V_L01_P005" (solid, pour order 5): 0,58.45 0,0 62.357,0 62.357,58.547

## Silkscreen, mask and mechanical layers (free items; w line width, h text height)
Top Overlay:
  drawing of 265 lines, arcs and shapes, not listed
  text "Kade, Charlie, Connor" at 20.193,2.879 h1.02
  text "Group31" at 7.493,2.413 h1.52